# Altium PCB ePBR24_ACU_Power_rev0.PcbDoc (part 3 of 4)
Units mil, origin at the board's own origin, x right, y up, seen from the top; angles counter-clockwise.
Board outline 8165 x 3858 mil, 2 copper layers (Top Layer, Bottom Layer); 138 components, 121 nets, 515 pads, 2055 vias.
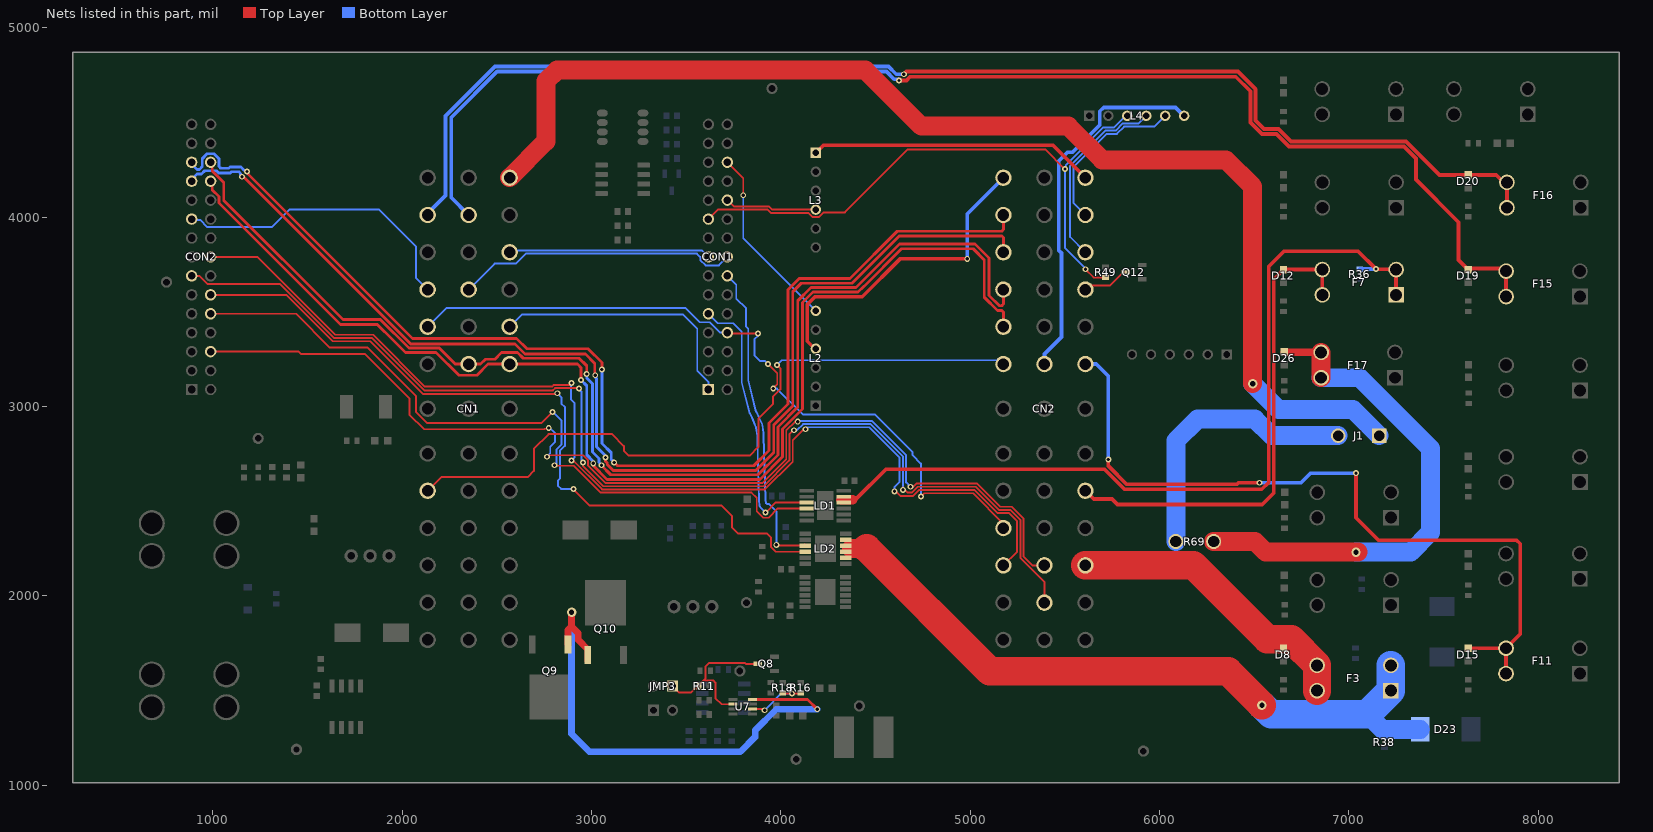
[diagram p2: the nets of this part, all layers, seen from the top]

## Via types
v1: diameter 31, hole 17, Top Layer to Bottom Layer, 2028 vias
v2: diameter 50, hole 28, Top Layer to Bottom Layer, 12 vias
v3: diameter 250, hole 137, Top Layer to Bottom Layer, 11 vias
v4: diameter 170, hole 128, Top Layer to Bottom Layer, 4 vias

## Nets (pads, with @x,y where several pads share a name; then routed paths per layer and width w, separated by ;. In a path a pad name is that pad's centre, name@x,y a point inside that pad or via, vN(x,y) a via of type N, cw(c..) or ccw(c..) an arc to the next point about the centre after c; other vN are vias at no path point) (continued)
AIR-_CTRL: CN1.11 CON1.B8 | length 1499.6
  Bottom Layer w10: CN1.11@2351.54,3617.92 2488.61,3755 2600,3755 2653,3808 3557,3808 3575.9,3789.1 3575.9,3772.55 3603.45,3745 3673.02,3745 CON1.B8@3718.02,3790
AIR-_FB: CN1.13 CN2.12 CON1.B4 | length 3875.1
  Top Layer w10: CON1.B4@3719,3390 3724,3385 v1(3880,3385) ; v1(3932,3225) 3981.5,3175.5 3981.5,3116.5 v1(3960,3095) ; v1(4740,2525) 4757.24,2542.24 5015.8,2542.24 5175.98,2382.05 CN2.12@5175.98,2358.08
  Bottom Layer w10: CN1.13@2135,3421.07 2233.93,3520 3498,3520 3573,3445 3626.08,3445 3681.08,3390 CON1.B4@3718.02,3390 ; v1(3880,3385) 3880,3375 3862.13,3357.13 3862.13,3268.82 3891.44,3239.52 3917.48,3239.52 v1(3932,3225) v1@3934.06,3222.95 ; v1(3960,3095) 3980,3095 4116.5,2958.5 4495.54,2958.5 4696,2758.04 4696,2742.89 4740,2698.89 v1(4740,2525)
AMS_CLR_ERR: CN1.9 CON1.A8 | length 1068.7
  Bottom Layer w10: CN1.9@2568.07,3814.77 2578.3,3825 3583.02,3825 CON1.A8@3618.02,3790
AMS_LED: CN2.37 L3.1 | length 1511.7
  Top Layer w20: L3.1@4185,4340 4225,4380 5437.53,4380 CN2.37@5609.06,4208.47
AMS_OK: CON1.B11 L3.4 | length 486.7
  Top Layer w10: CON1.B11@3719,4090 3752,4057 3937.04,4057 3954.04,4040 L3.4@4185,4040
AMS_PWR: CN1.5 D19.1 F15.3 F15.4 | length 7099
  Top Layer w20: v1@4620.64,4718.14 v1(4625,4722.5) 4630.77,4728.27 4636.54,4722.5 4663.46,4722.5 4682.5,4741.54 4682.5,4742 6403,4742 6480,4665 6480,4500 6541,4439 6617.82,4439 6683.82,4373 7291.62,4373 7354.43,4310.18 7354.43,4198.75 7580,3973.18 7580,3773.46 D19.1@7630,3723.46 7635.43,3728.9 F15.4@7830.12,3728.9 ; F15.3@7830.12,3589.61 F15.4@7830.12,3723.46
  Bottom Layer w20: CN1.5@2351.54,4011.62 2260,4103.16 2260,4526.82 2502.18,4769 4557.82,4769 4598.82,4728 4619.5,4728 v1(4625,4722.5)
B\R\A\K\E\_\P\R\E\S\S\: CN2.28 Q12.3 | length 249.8
  Top Layer w10: CN2.28@5609.06,3617.92 5631.13,3640 5739.88,3640 5809.88,3710 Q12.3@5820.71,3710
BRAKE_LIGHT_GND: CN2.23 L4.6 | length 1954.7
  Bottom Layer w20: CN2.23@5392.52,3224.22 5392.52,3277.35 5482,3366.83 5482,3810.39 5468.5,3823.89 5468.5,4296.5 5514.5,4342.5 5541.24,4342.5 5685,4486.26 5685,4559.04 5705.48,4579.52 6085.48,4579.52 L4.6@6130,4535
BRAKE_PRESS: CON1.A10 L4.3 R49.1 | length 3280
  Top Layer w10: CON1.A10@3618.02,3990 3668.02,4040 3930,4040 3947,4023 4146.11,4023 4168.63,4000.48 4201.37,4000.48 4225.89,4025 4338.89,4025 4671.89,4358 5397,4358 v1(5501,4254) ; v1(5609.06,3725) 5651.61,3682.44 R49.1@5715,3682.44
  Bottom Layer w10: CON1.A10@3619,3990 CON1.A10@3635,3990 ; v1(5609.06,3725) 5609.06,3729.6 5501,3837.66 v1(5501,4254) 5505.02,4258.02 5505.02,4275.17 5703.85,4474 5761,4474 5822,4535 L4.3@5830,4535
BRAKE_PWR: CN2.22 D15.1 F11.3 F11.4 | length 4068.7
  Top Layer w20: v1(5730,2720) 5730,2686.55 5826.55,2590 6410.12,2590 6417.62,2597.5 v1(6528.96,2597.5) ; v1(7038,2648) 7038,2413 7156.93,2294.07 7885.93,2294.07 7905,2275 7905,1798.35 F11.4@7830.12,1723.46 ; D15.1@7630,1723.46 F11.4@7830.12,1723.46 ; F11.3@7830.12,1589.61 F11.4@7830.12,1723.46
  Bottom Layer w20: CN2.22@5609.06,3224.22 5665.78,3224.22 5730,3160 v1(5730,2720) ; v1(6528.96,2597.5) 6747.5,2597.5 6798,2648 v1(7038,2648)
BRAKE_SENS: CN2.31 L4.4 | length 1000.8
  Bottom Layer w10: CN2.31@5609.06,3814.77 5528.5,3895.33 5528.5,4271.65 5713.85,4457 5768.04,4457 5806.04,4495 5890,4495 L4.4@5930,4535
BRAKE_SW: CN2.34 L4.5 | length 875.8
  Bottom Layer w10: CN2.34@5609.06,4011.62 5609.06,4012.57 5545.5,4076.13 5545.5,4264.61 5720.89,4440 5775.08,4440 5813.08,4478 5973,4478 L4.5@6030,4535
BSPD_LED: CN2.39 L2.4 | length 1710.3
  Top Layer w20: L2.4@4185,3300 4140,3345 4140,3539.42 4180.58,3580 4430,3580 4630,3780 v1(4985,3780)
  Bottom Layer w20: v1(4985,3780) 4985,4017.49 CN2.39@5175.98,4208.47
BSPD_OK: CON1.B13 L2.6 | length 978.4
  Top Layer w10: CON1.B13@3718.02,4290 3802,4206.02 v1(3802,4115.82)
  Bottom Layer w10: v1(3802,4115.82) 3802,3888 L2.6@4185,3505
BSPD_TEST: CN1.3 J1.1 | length 6423.5
  Top Layer w100: CN1.3@2568.07,4208.47 2760,4400.4 2760,4718.42 2818.58,4777 4447,4777 4743,4481 5519,4481 5697,4303 6351,4303 6492,4162 6492,3121.19 v2(6492.19,3121)
  Bottom Layer w100: v2(6492.19,3121) 6629.69,2983.5 7022.77,2983.5 J1.1@7160.27,2846
BSPD_TEST_OUT: J1.2 R69.2 | length 1473.6
  Bottom Layer w100: R69.2@6086.2,2287 6086.2,2819.2 6200.78,2933.78 6504.09,2933.78 6591.87,2846 J1.2@6943.74,2846
BSPD_TEST_PWR: D26.1 F17.3 F17.4 R69.1 | length 2725
  Top Layer w40: D26.1@6660.43,3285.93 F17.4@6854.12,3285.93
  Top Layer w100: R69.1@6286.2,2287 6505.35,2287 6561.35,2231 v2(7038,2231) v2@7049,2231 ; F17.3@6854.12,3152.07 F17.4@6854.12,3285.93
  Bottom Layer w100: F17.3@6854.12,3152.07 7057.93,3152.07 7431,2779 7431,2335 7327,2231 v2(7038,2231)
BUZR_CTRL: CON1.A5 LD1.3 | length 1503.1
  Top Layer w10: v1(3920,2440) 3973.22,2493.22 4137.09,2493.22 LD1.3@4137.56,2492.75
  Bottom Layer w10: CON1.A5@3618.02,3490 3668.02,3440 3750,3440 3794.13,3395.87 3794.13,3158.47 3794,3158.34 3794,3125.38 3834.42,2966.87 ; v1(3920,2440) 3893.68,2466.32 3888.57,2475.58 3887.99,2478.14 3887.87,2478.72 3886.06,2496.41 3885.91,2498.85 3875.79,2839.71 3875.59,2845.61 3873.79,2858.85 ; 3834.42,2966.87 cw(c3588.84,2815.58) 3858.96,2916.74 ; 3834.42,2966.87 cw(c3588.84,2815.58) 3858.96,2916.74 ; 3858.96,2916.74 3868.31,2891.84 3871.94,2870.41 3872.11,2869.47 ; 3872.11,2869.47 cw(c3623.11,2824.62) 3873.79,2858.85 ; 3872.11,2869.47 cw(c3623.11,2824.62) 3873.79,2858.85
BUZR_FB: CON2.B5 LD1.4 | length 3944.6
  Top Layer w10: CON2.B5@989,3490 1440,3490 1619,3311 1818.79,3311 2073,3056.79 2073,2971.78 2130.79,2914 2736.74,2914 v1(2794.53,2971.78) ; v1(2805,2690) 2813,2690 2814,2691 2817.5,2687.5 2906.39,2687.5 2916.89,2677 2917.12,2677 3049.12,2545 3845.45,2545 3872.99,2517.47 3872.99,2448.12 3908.61,2412.5 3935.75,2412.5 3984.97,2461.72 4137.09,2461.72 LD1.4@4137.56,2461.25
  Bottom Layer w10: v1(2794.53,2971.78) 2842.5,2923.81 2842.5,2799.62 2816.5,2773.62 2816.5,2701.5 v1(2805,2690)
BUZR_FUSE: F7.1 F7.2 LD1.10 LD1.11 R36.1 | length 4490
  Top Layer w20: 4379.66,2508.5 4394.22,2508.5 4554.96,2669.24 5709.13,2669.24 5815.37,2563 6540.42,2563 6577,2599.58 6577,3739 6658,3820 7049,3820 v1(7143,3726) 7144.27,3724.73 7248.61,3724.73 F7.2@7249.88,3723.46 F7.1@7249.88,3589.61
  Top Layer w50: 4317.36,2508.5 4379.66,2508.5
  Bottom Layer w20: R36.1@7058.22,3725.78 7142.78,3725.78 v1(7143,3726)
BUZR_PWR: CN2.13 D12.1 F7.3 F7.4 | length 2591
  Top Layer w20: CN2.13@5609.06,2554.93 5652.98,2511 5748.55,2511 5777.55,2482 6542.96,2482 6604,2543.04 6604,3672.46 D12.1@6655,3723.46 F7.4@6860.12,3723.46 F7.3@6860.12,3589.61
CAN_N: CN2.36 CON2.A13 | length 6385.7
  Top Layer w15: v1(1181.71,4240.71) 1181.71,4233.29 2055,3360 2604.11,3360 2659.11,3305 2982,3305 3055,3232 v1(3055,3195) ; v1(3120,2705) 3137.79,2687.21 3857.71,2687.21 3937.77,2767.27 3937.77,2913.82 4038,3014.05 4038,3616.49 4098.01,3676.5 4366.14,3676.5 4615.24,3925.59 4952.43,3925.59 4952.63,3925.8 5167.2,3925.8 5175.98,3934.59 CN2.36@5175.98,4011.62
  Bottom Layer w15: CON2.A13@889,4290 889,4281.04 917.54,4252.5 929.96,4252.5 944.38,4266.92 944.38,4308.48 970.52,4334.62 1007.48,4334.62 1033.62,4308.48 1033.62,4266.92 1042.4,4258.13 1084.02,4258.13 1090.54,4264.65 1148.58,4264.65 1165.25,4247.99 1170.11,4247.99 1177.38,4240.71 v1(1181.71,4240.71) ; v1(3055,3195) 3055,2805.67 3105,2755.67 3105,2720 v1(3120,2705)
CAN_P: CN2.33 CON2.A12 | length 6302.9
  Top Layer w15: v1(1154.84,4213.84) 1162.27,4213.84 2045.55,3330.56 2595.55,3330.56 2649.11,3277 2968,3277 3017.5,3227.5 3017.5,3173.61 v1@3023.17,3167.95 ; v1(3075,2730.5) 3075,2711.21 3083.78,2702.43 3083.78,2693.62 3115.4,2662 3868.15,2662 3962.97,2756.82 3962.97,2903.38 4063.21,3003.61 4063.21,3606.05 4108.45,3651.29 4376.59,3651.29 4625.68,3900.38 4962.87,3900.38 4963.08,3900.59 5167.2,3900.59 5175.98,3891.81 CN2.33@5175.98,3814.77
  Bottom Layer w15: CON2.A12@889,4190 889,4198.96 917.54,4227.5 940.32,4227.5 958.2,4245.38 1019.8,4245.38 1032.05,4233.13 1094.38,4233.13 1100.9,4239.65 1138.23,4239.65 1147.57,4230.31 1147.57,4225.45 1154.84,4218.17 v1(1154.84,4213.84) ; v1@3015,3166.39 v1@3016.39,3165 ; v1@3024,3157.39 v1@3020,3161.39 ; v1(3075,2730.5) 3075,2740 3027,2788 3027,3148 3020,3155 v1@3020,3161.39 ; v1@3016.39,3165 v1@3020,3161.39 ; v1@3016.39,3165 v1(3020,3165) v1@3020,3161.39
CAN_SENS_N: CN1.17 CN2.30 CON2.B13 | length 6510.3
  Top Layer w15: CON2.B13@989,4290 997.66,4281.34 997.66,4244.44 1058.62,4183.48 1058.62,4088.82 1687.44,3460 1885,3460 2036.44,3308.56 2196.44,3308.56 2280.78,3224.22 CN1.17@2351.54,3224.22 2414.22,3224.22 2440,3250 2490,3250 2525,3285 2610,3285 2640,3255 2935,3255 2975,3215 v1(2975,3172.42) ; v1@3053.78,2688.62 3102.4,2640 3880.42,2640 3984.97,2744.56 3984.97,2892.05 4090,2997.07 4090,3558.72 4160.28,3629 4398,3629 4627,3858 5026.57,3858 5099.51,3785.06 5099.51,3587.26 5154.77,3532 5167.2,3532 5175.98,3540.78 CN2.30@5175.98,3617.92
  Bottom Layer w15: v1(2975,3172.42) 2975,3150.25 3005,3120.25 3005,2760 3040,2725 3040,2703.78 v1(3053.78,2690)
CAN_SENS_P: CN1.18 CN2.27 CON2.B12 | length 6445.8
  Top Layer w15: CON2.B12@989,4190 997.66,4181.34 997.66,4144.44 1033.62,4108.48 1033.62,4074.07 1675.18,3432.5 1869.12,3432.5 1905.62,3396 1906.58,3396 2017.58,3285 2180,3285 2300,3165 2395,3165 2454.22,3224.22 CN1.18@2568.07,3224.22 2925.78,3224.22 2945,3205 v1(2945,3140) ; v1(3010,2700) 3010,2688.62 3083.12,2615.5 3890.57,2615.5 4009.47,2734.41 4009.47,2881.9 4114.5,2986.93 4114.5,3548.57 4170.43,3604.5 4408.15,3604.5 4438.07,3634.42 4438.77,3634.42 4637.36,3833 5016.21,3833 5074.51,3774.7 5074.51,3576.9 5144.42,3507 5167.2,3507 5175.98,3498.21 CN2.27@5175.98,3421.07
  Bottom Layer w15: v1(2945,3140) 2975,3110 2975,2745 3010,2710 v1(3010,2700)
CHASSIS_GND: CN1.25 CN2.24 | length 3736.3
  Top Layer w10: CN1.25@2135,2554.93 2207.31,2627.24 2663.26,2627.24 2696,2659.98 2696,2776.12 2773.88,2854 3109.08,2854 3171.79,2791.29 3171.79,2766.29 3197.38,2740.71 3835.55,2740.71 3882,2787.16 3882,2936.74 3958.06,3012.8 3958.06,3050.43 3998.5,3090.87 3998.5,3201.37 v1(3980,3219.87)
  Bottom Layer w10: v1(3980,3219.87) 4004.65,3244.52 5142.11,3244.52 5147.59,3250 5165.21,3250 5165.21,3235 CN2.24@5175.98,3224.22
COOL_SYS_TEMP1: CN2.5 CON2.A7 | length 6110.5
  Top Layer w10: CON2.A7@889,3690 929.44,3690 971.55,3647.88 1354.24,3647.88 1640.12,3362 1839.92,3362 2116.92,3085 2796.11,3085 2808.61,3097.5 v1@2921.44,3097.5 ; 2955,2687.21 3063.21,2579 3909.46,2579 4046,2715.54 4046,2854.85 4070,2878.85 v1(4070,2875) ; v1(4645,2560) 4645,2571.39 4671.39,2545 4692.65,2545 4712.5,2564.85 4712.5,2565.43 4723.3,2576.24 5029.88,2576.24 5152.11,2454 5212.65,2454 5265.29,2401.36 5265.29,2200.82 5392.52,2073.59 CN2.5@5392.52,1964.38
  Bottom Layer w10: v1(2935,3095) 2935,3091.5 2947.5,3079 2947.5,2718.28 2955,2710.78 v1(2955,2704.5) ; v1(4070,2875) 4085,2875 4117.5,2907.5 4474.42,2907.5 4645,2736.92 v1(4645,2560)
COOL_SYS_TEMP2: CN2.8 CON2.B3 | length 5663.2
  Top Layer w10: CON2.B3@989,3290 1454.02,3290 1467.02,3277 1804.71,3277 2039,3042.71 2039,2957.7 2116.7,2880 2750.82,2880 2753.3,2882.48 2770.31,2882.48 v1(2774.32,2886.5) ; v1(2765,2735) 2772.5,2742.5 2955.89,2742.5 2982.5,2715.89 2982.5,2688.54 3075.04,2596 3902.42,2596 4029,2722.58 4029,2873.79 4075.21,2920 v1(4090,2920) ; v1(4685,2576.24) 4699.26,2576.24 4716.26,2593.24 5037.74,2593.24 5159.97,2471 5219.7,2471 5282.29,2408.4 5282.29,2207.86 5328.92,2161.23 CN2.8@5392.52,2161.23
  Bottom Layer w10: v1(2765,2735) 2782.5,2752.5 2782.5,2787.71 2808.5,2813.71 2808.5,2859.19 2799.36,2868.34 2798.17,2868.34 2780.01,2886.5 v1(2774.32,2886.5) ; v1(4090,2920) 4095.5,2920 v1@4100,2924.5 ; v1@4096.57,2924.5 v1@4100,2924.5 ; v1(4685,2576.24) 4662,2599.24 4662,2743.96 4481.46,2924.5 v1@4100,2924.5
COOL_SYS_TEMP3: CN2.9 CON2.B8 | length 5892.8
  Top Layer w10: CON2.B8@989,3790 1236.17,3790 1647.17,3379 1846.96,3379 2120.96,3105 2792.07,3105 2801.57,3114.5 2885.5,3114.5 2895,3124 v1(2895,3125) ; v1(2895,2715) 2903.17,2715 3056.17,2562 3916.5,2562 4063,2708.5 4063,2821.04 4121.96,2880 v1(4130,2880) ; v1(4600,2552.14) 4607.79,2552.14 4631.93,2528 4699.7,2528 4729.5,2557.8 4729.5,2558.39 4730.35,2559.24 5022.84,2559.24 5145.07,2437 5205.61,2437 5248.29,2394.32 5248.29,2233.54 CN2.9@5175.98,2161.23
  Bottom Layer w10: v1@2892.5,3125 2892.5,3036.92 2910.5,3018.92 2910.5,2730.5 v1(2895,2715) ; v1(4130,2880) 4123.43,2880 4133.93,2890.5 4467.38,2890.5 4628,2729.88 4628,2601.89 4600,2573.89 v1(4600,2552.14)
DELAYED_UV: JMP3.1 Q8.3 R11.2 U7.2 | length 837.1
  Top Layer w10: JMP3.1@3428,1524 3462,1490 3526.72,1490 3548.01,1511.29 3558.66,1511.29 3567.44,1520.07 R11.2@3567.44,1524.01 3567.44,1527.94 3593.22,1553.72 ; U7.2@3751.14,1430.51 U7.2@3748.43,1427.8 3687.2,1427.8 3655,1460 3655,1541.56 3642.83,1553.72 3593.22,1553.72 ; Q8.3@3874.19,1644.84 Q8.3@3878.32,1640.72 3815.8,1640.72 3811.68,1644.84 3620.52,1644.84 3602.43,1626.75 3602.43,1562.94 3593.22,1553.72
EMETER_PWR: CN1.4 D20.1 F16.3 F16.4 | length 6772.1
  Top Layer w20: v1@4649.69,4754.69 v1(4650,4755) 4664,4769 6414.18,4769 6507,4676.18 6507,4511.18 6552.18,4466 6629,4466 6695,4400 7302.8,4400 7479.34,4223.46 D20.1@7630,4223.46 7778.55,4223.46 7818.16,4183.86 F16.4@7835.12,4183.86 F16.3@7835.12,4050
  Bottom Layer w20: CN1.4@2135,4011.62 2135,4020 2230,4115 2230,4535 2491,4796 4569,4796 4610,4755 v1(4650,4755)
EXTRA_INPUT1: CN1.15 CON1.A1 | length 1394.3
  Bottom Layer w10: CN1.15@2568.07,3421.07 2633,3486 3483.92,3486 3558.9,3411.02 3558.9,3189.55 3618.02,3130.44 CON1.A1@3618.02,3090
EXTRA_INPUT2: CN1.10 CON2.A10 | length 1573.5
  Bottom Layer w10: CON2.A10@889,3990 893.68,3985.32 934.12,3985.32 971.55,3947.88 1311.9,3947.88 1404.02,4040 1878.66,4040 2072.92,3845.74 2072.92,3680 CN1.10@2135,3617.92
F\A\U\L\T\2\: R16.1 R18.2 U7.6 | length 353.7
  Top Layer w10: U7.6@3851.57,1402.2 3851.66,1402.12 3908.88,1402.12 v1(3914.97,1396.03) ; R18.2@4010,1486.44 4011.22,1485.22 4058.78,1485.22 v1(4060,1484) 4061.22,1485.22 4104.78,1485.22 R16.1@4106,1486.44
  Bottom Layer w10: v1(3914.97,1396.03) 4003.6,1484.65 v1@4068,1484.65
FANS_CTRL: CON1.B7 LD2.3 | length 1699.8
  Top Layer w10: v1(3976.52,2269.49) 3979.02,2266.99 4126.96,2266.99 LD2.3@4129.46,2264.49 ; LD2.3@4126.33,2271.62 LD2.3@4128.46,2269.49
  Bottom Layer w10: CON1.B7@3718.02,3690 3765,3643.02 3765,3570 3817,3518 3817,3421.08 3828.13,3409.95 3828.13,3144.39 3828,3144.25 3828,3139.31 3866.22,2979.99 ; v1(3976.52,2269.49) 3976.52,2446.42 3938.43,2484.5 3927.73,2484.5 3921.87,2490.36 3919.71,2507.18 3909.58,2847.71 3909.37,2854.63 3909.11,2859.89 3902.31,2905.96 3881.57,2950.78 ; 3866.22,2979.99 cw(c3588.84,2815.58) 3881.57,2950.78 ; 3866.22,2979.98 cw(c3588.84,2815.58) 3881.57,2950.78
FANS_FB: CON2.B6 LD2.4 | length 4084.7
  Top Layer w10: CON2.B6@989,3590 1388.08,3590 1633.08,3345 1832.88,3345 2112.88,3065 2113.18,3065.31 2815.31,3065.31 v1(2820,3070) ; v1@2905,2564 2992,2477 3687.04,2477 3742,2422.04 3742,2362.4 3775.9,2328.5 3927.58,2328.5 3949.02,2307.07 3949.02,2258.1 3974.12,2232.99 LD2.4@4129.46,2232.99
  Bottom Layer w10: v1(2820,3070) 2841.5,3048.5 2841.5,3015.79 2859.5,2997.79 2859.5,2792.58 2833.5,2766.58 2833.5,2619.53 2822.5,2608.53 2822.5,2582.5 2840,2565 v1(2905,2565)
FANS_FUSE: D23.2 F3.1 F3.2 LD2.8 LD2.9 LD2.10 LD2.11 R38.1 | length 3708.2
  Top Layer w100: 4374.51,2250.82 4455,2250.82
  Top Layer w150: 4455,2250.82 5104.05,1601.77 6362.23,1601.77 v2(6541,1423)
  Bottom Layer w100: 7097.59,1375 7177.59,1295 D23.2@7377.14,1295
  Bottom Layer w150: v2(6541,1423) 6589,1375 7097.59,1375 F3.1@7221.88,1499.29 F3.2@7221.88,1633.15
FANS_PWR: CN2.7 D8.1 F3.3 F3.4 | length 1576.6
  Top Layer w150: CN2.7@5609.06,2161.23 6179.37,2161.23 6569.89,1770.71 6696.16,1770.71 6832.12,1634.75 F3.4@6832.12,1633.15 F3.3@6832.12,1499.29
GATE: Q9.1 Q10.1 U7.8 | length 2851.5
  Top Layer w15: U7.8@3851.57,1453.39 4140.61,1453.39 v1(4193,1401)
  Top Layer w35: Q9.1@2876,1743.5 2876.5,1744 2876.5,1819.5 2895,1838 ; v2@2897.87,1910.13 v2(2895,1913) 2895,1838 ; Q10.1@2981,1657.88 Q10.1@2981,1687.38 2981,1716.88 2931,1766.88 2931,1802 2895,1838
  Bottom Layer w35: v2(2895,1913) 2895,1271.59 2989.42,1177.16 3073,1177.16 3786.81,1177.16 3864.5,1254.85 3864.5,1288.98 3976.52,1401 v1(4193,1401)

## Text inside footprints (layer, text, board x,y; h text height)
CON1: Top Overlay "B15" at 3790.85,4477.2 h30; Top Overlay "A15" at 3469,4474.25 h30; Top Overlay "B1" at 3785.93,3046.89 h30; Top Overlay "A1" at 3506.4,3038.03 h30
CON2: Top Overlay "B15" at 1061.83,4477.2 h30; Top Overlay "A15" at 739.98,4474.25 h30; Top Overlay "B1" at 1056.91,3046.89 h30; Top Overlay "A1" at 777.39,3038.03 h30
Q9: Mechanical 1 "*" at 2876,1653 h31.25 r180
Q10: Mechanical 1 "*" at 2981,1777.88 h31.25
WM1: Top Overlay "1" at 1360.15,2389.23 h30
WM9796-ND: Top Overlay "1" at 374,1362 h30